# Altium PCB 856_PCB_MB.PcbDoc
Units mm, origin at the board's own origin, x right, y up, seen from the top; angles counter-clockwise.
Board outline 150 x 115 mm, 4 copper layers (Top Layer, GND, Power, Bottom Layer), stack 0.603 mm thick; 26 components, 53 nets, 263 pads, 0 vias.
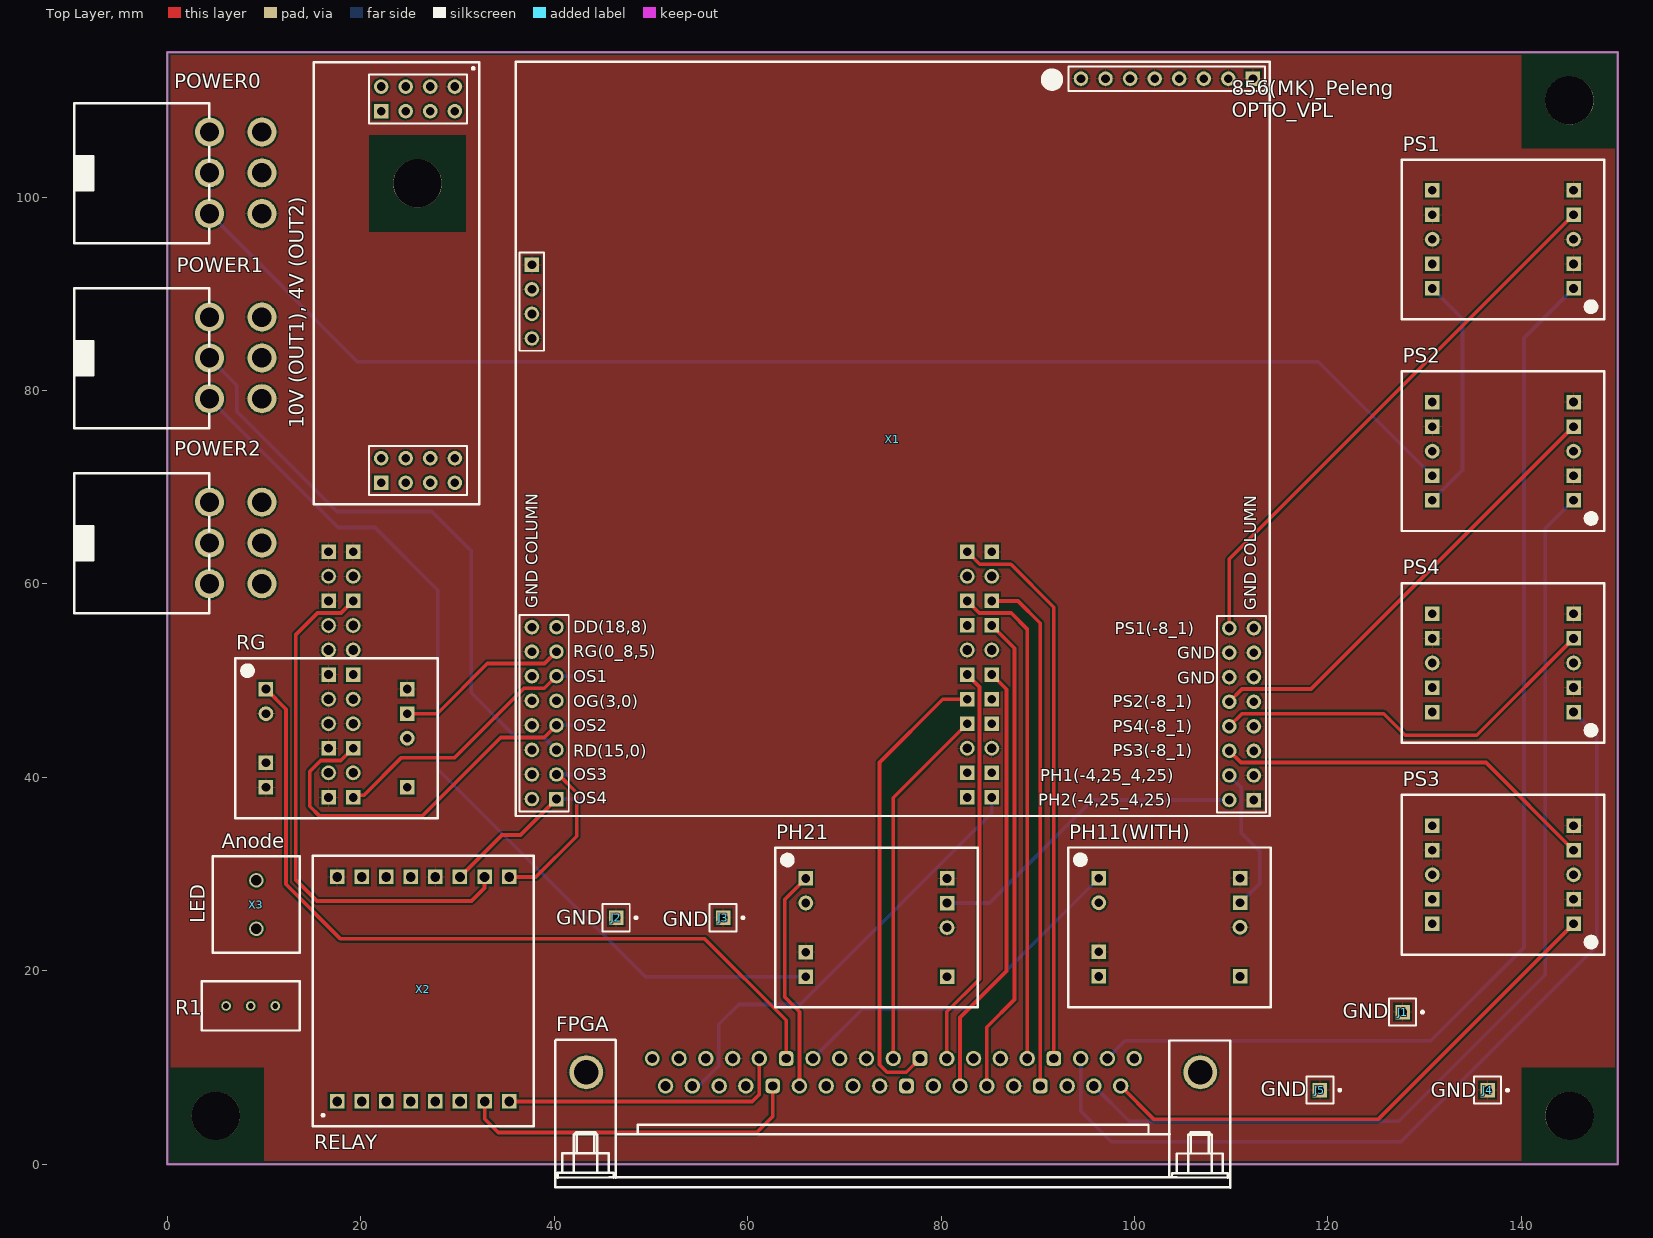
[diagram p0: Top Layer view]
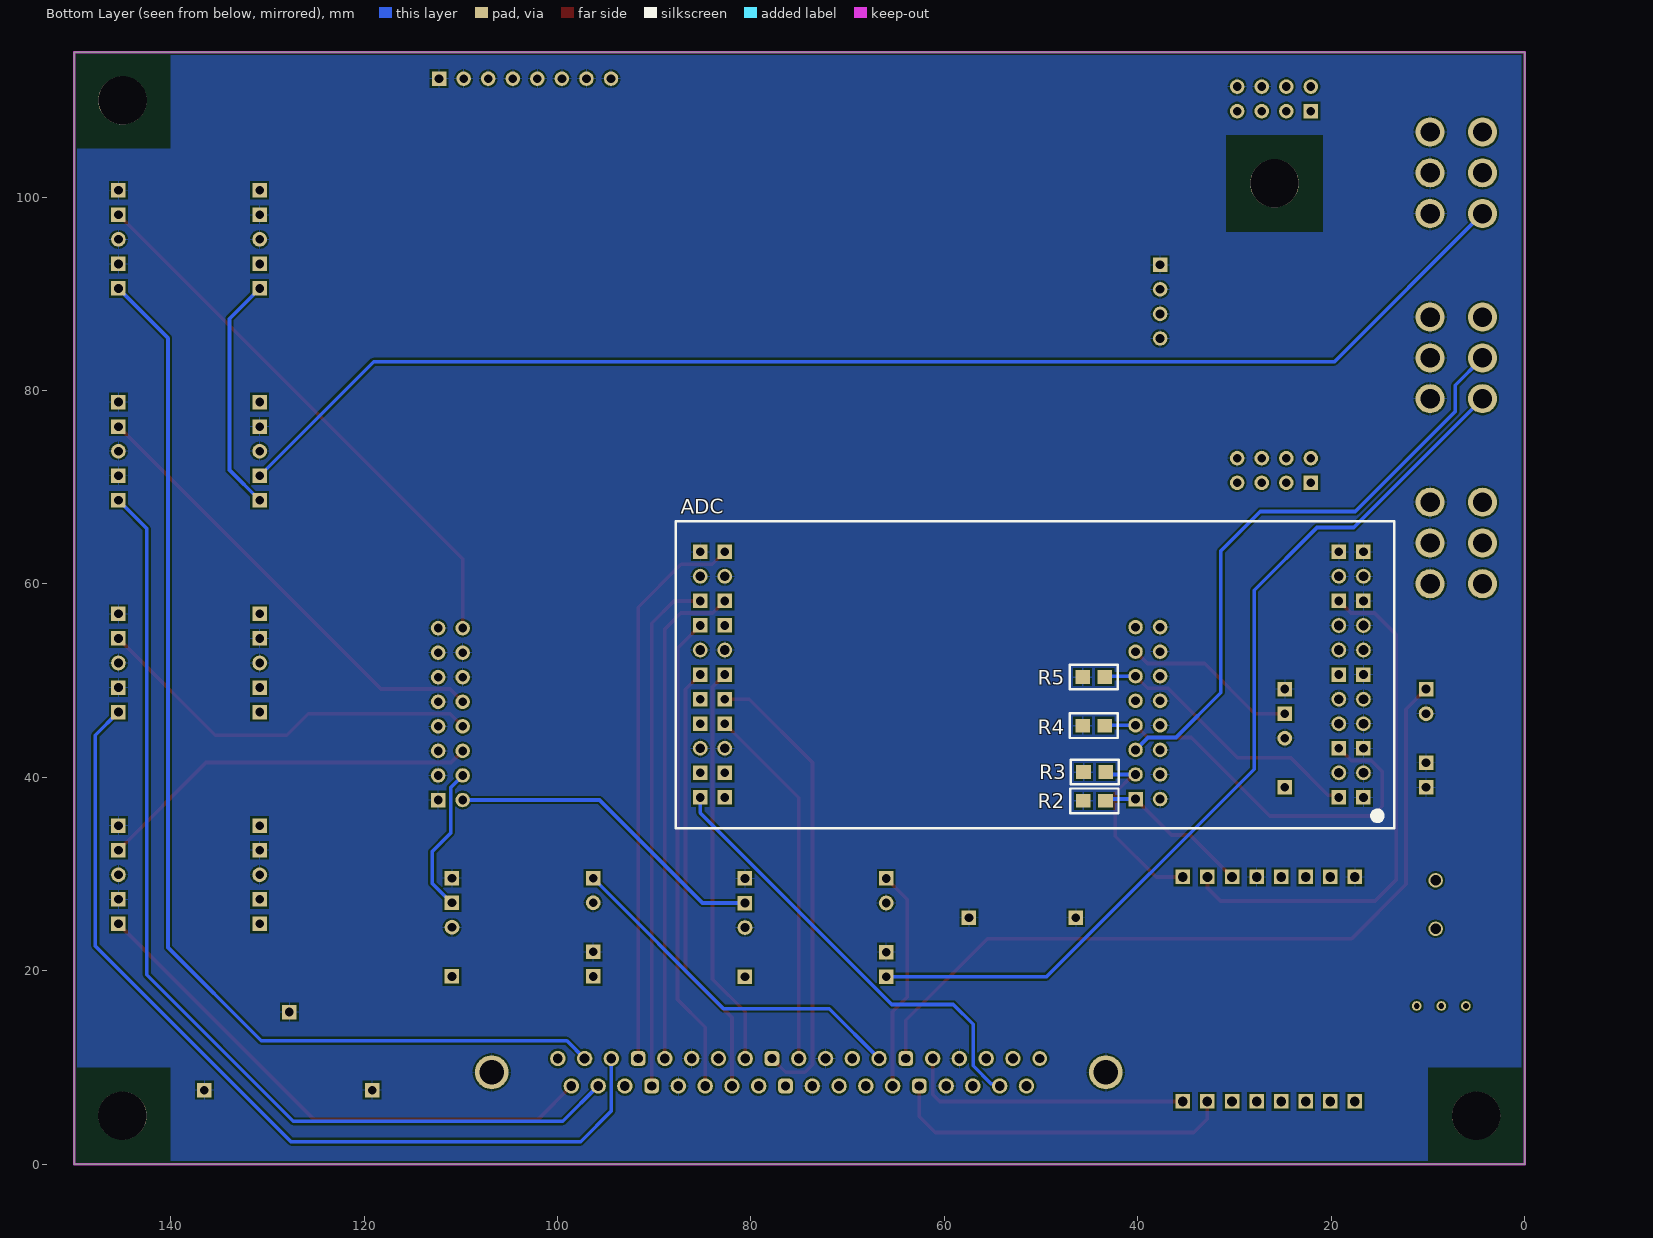
[diagram p1: Bottom Layer view, seen from below]
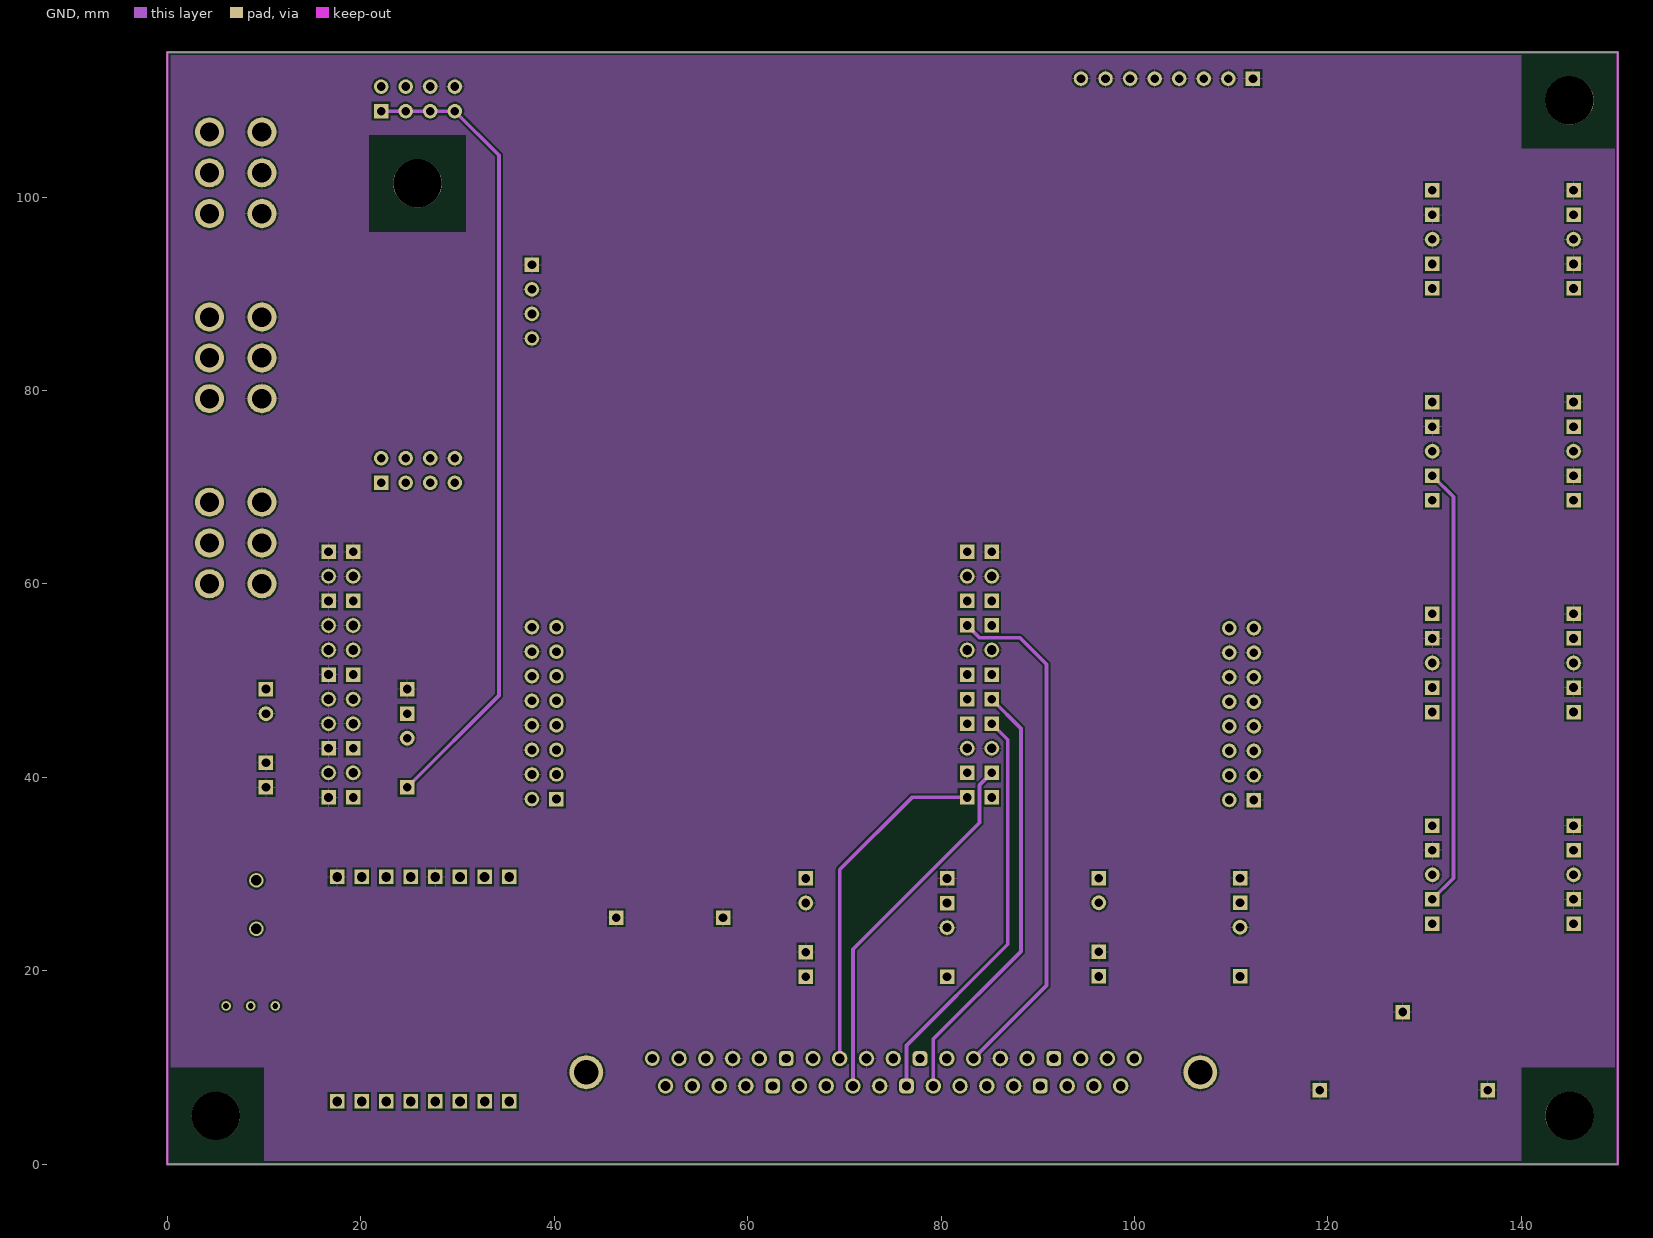
[diagram p2: GND]
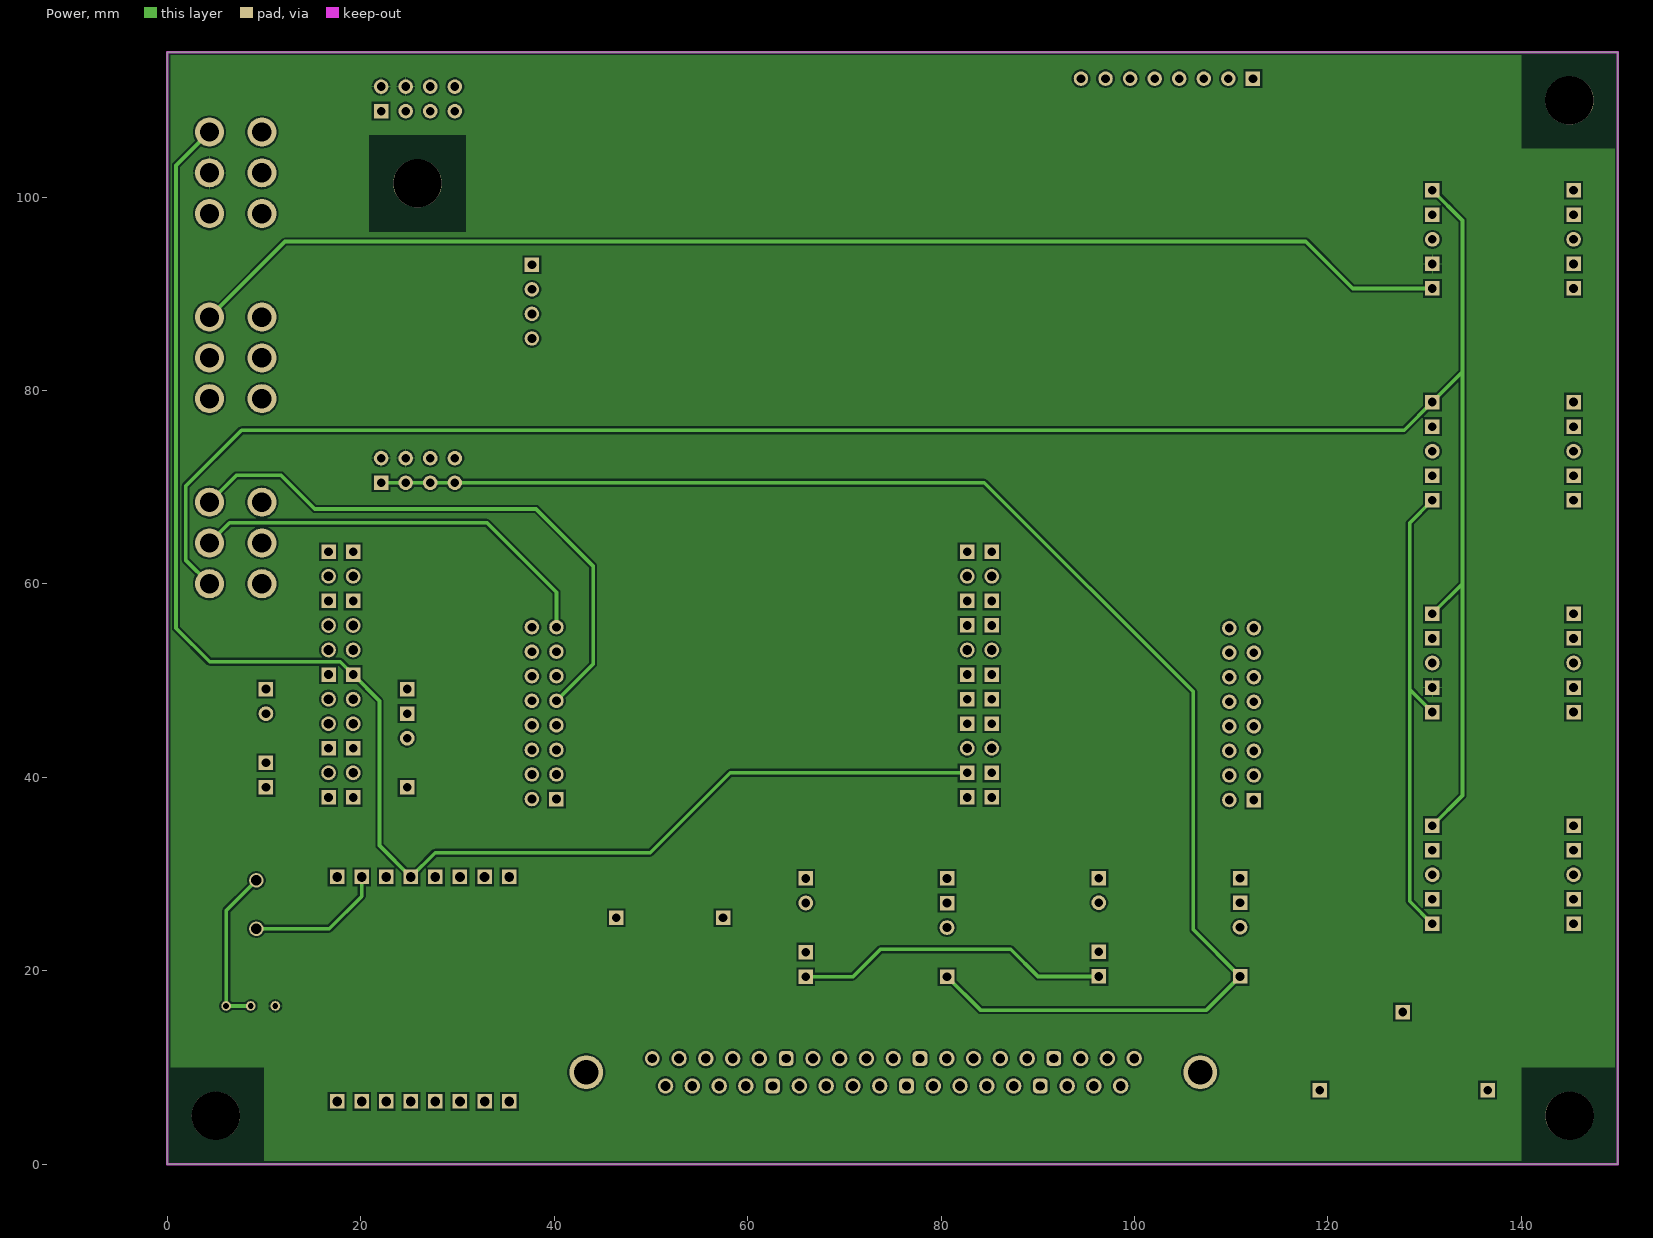
[diagram p3: Power]

## Layer stack, top to bottom
Top Solder: solder mask 0.0102, Solder Resist, Dk 3.5
Top Layer: signal copper 0.0356
Dielectric 2: prepreg 0.0711, PP-006, Dk 4.1
GND: signal copper 0.035
Dielectric 1: dielectric 0.32, FR-4, Dk 4.8
Power: signal copper 0.035
Dielectric 3: prepreg 0.0711, PP-006, Dk 4.1
Bottom Layer: signal copper 0.0356
Bottom Solder: solder mask 0.0102, Solder Resist, Dk 3.5

## Board outline
0,0 150,0 150,115 0,115

## Design rules (kind name [scope] priority, off if disabled: settings)
BoardOutlineClearance [OnLayer('Multi-Layer')] p1: gap=0.254 ignorepadtopadclearanceinfootprint=FALSE except(0: Arc-SplitContinuation Track-SplitContinuation SMDPad-SplitContinuation THPad-SplitContinuation Via-SplitContinuation Fill-SplitContinuation Poly-SplitContinuation Region-SplitContinuation Text-SplitContinuation; 0.4: Arc-OutlineEdge Track-OutlineEdge SMDPad-OutlineEdge THPad-OutlineEdge Via-OutlineEdge Fill-OutlineEdge Poly-OutlineEdge Region-OutlineEdge Text-OutlineEdge)
Clearance [All] p1: gap=0.125 ignorepadtopadclearanceinfootprint=FALSE except(0.2: Arc-Fill Arc-Poly Track-Fill Track-Poly SMDPad-Fill SMDPad-Poly THPad-Fill THPad-Poly Via-Fill Via-Poly Fill-Fill Fill-Poly Poly-Poly Poly-Region Poly-Text; 0.25: Arc-Hole Track-Hole SMDPad-Hole THPad-Hole Via-Hole Fill-Hole Poly-Hole Region-Hole Text-Hole) // Standart
DiffPairsRouting [All] p1: maxlimit=0.254 minlimit=0.127 mostfreqgap=0.13 toplayer_minwidth=0.127 toplayer_maxwidth=0.381 toplayer_prefwidth=0.37 midlayer1_minwidth=0.127 midlayer1_maxwidth=0.381 midlayer1_prefwidth=0.37 midlayer2_minwidth=0.127 midlayer2_maxwidth=0.381 midlayer2_prefwidth=0.37 bottomlayer_minwidth=0.127 bottomlayer_maxwidth=0.381 bottomlayer_prefwidth=0.37 maxuncoupledlength=12.7
HoleSize [All] p1: absolutevalues=TRUE maxlimit=5 minlimit=0.3 maxpercent=80.000 minpercent=20.000
MinimumSolderMaskSliver [All] p1: minsoldermaskwidth=0.1
PlaneClearance "PlaneClearance-1 1/2 Oz" [All] p1: clearance=0.2 // Standart
PlaneConnect "TermalConnect-1 1/2 Oz" [All] p1: planeconnectstyle=Relief reliefexpansion=0.2 reliefentries=4 reliefconductorwidth=0.2 reliefairgap=0.2 // Standart
PolygonConnect "PolygonConnect-1 1/2 Oz" [All] p1: thpad.connectstyle=Relief thpad.reliefconductorwidth=0.15 thpad.reliefentries=4 thpad.polygonreliefangle="90 Angle" thpad.airgapwidth=0.2 smdpad.connectstyle=Relief smdpad.reliefconductorwidth=0.2 smdpad.reliefentries=4 smdpad.polygonreliefangle="90 Angle" smdpad.airgapwidth=0.2 via.connectstyle=Direct via.reliefconductorwidth=0.254 via.reliefentries=4 via.polygonreliefangle="90 Angle" via.airgapwidth=0.254 // Standart
RoutingVias [All] p1: holewidth=0.3 width=1.27 viastyle="Through Hole" minholewidth=0.3 minwidth=0.6 maxholewidth=0.711 maxwidth=1.27
SilkToSilkClearance [All] p1: silktosilkclearance=0
SilkToSolderMaskClearance [IsPad] p1: minsilkscreentomaskgap=0 clearancetoexposedcopper=TRUE
SolderMaskExpansion [All] p1: expansion=0.102 istentingtop=FALSE
UnRoutedNet [All] p1: checkbadconnections=TRUE
Width [All] p1: maxlimit=2.5 minlimit=0.125 preferedwidth=0.37
22 further rules are at their usual default settings.

## Components (designator, comment, footprint, x,y, rotation, side; value= is the part's Value field where it differs from the comment)
"10V (OUT1), 4V (OUT2)" "MEZ_POWER" MEZON_POWER_NEW 29.718,111.43 r270 top
ADC "MEZON_ADC" MEZON_ADC 16.662,37.922 r0 bottom
FPGA "CHEAP_CON_37_FEMALE" CHEAP_CONN_FEMALE 106.807,9.5 r180 top
J1 "GND" PIN1 127.737,15.723 r270 top
J2 "GND" PIN1 46.406,25.476 r270 top
J3 "GND" PIN1 57.455,25.476 r270 top
J4 "GND" PIN1 136.525,7.645 r270 top
J5 "GND" PIN1 119.177,7.645 r270 top
PH11(WITH) "MEZON_H" MEZON_H 96.317,29.566 r0 top
PH21 "MEZON_H" MEZON_H 66.015,29.54 r0 top
POWER0 "POWER" POWER 4.343,106.731 r90 top
POWER1 "POWER" POWER 4.343,87.592 r90 top
POWER2 "POWER" POWER 4.343,68.453 r90 top
PS1 "MEZON_V+15" MEZON_V 145.415,90.551 r180 top
PS2 "MEZON_V" MEZON_V 145.415,68.648 r180 top
PS3 "MEZON_V" MEZON_V 145.415,24.841 r180 top
PS4 "MEZON_V+15" MEZON_V 145.415,46.744 r180 top
R1 "3296" PODSTR_RES_3296 11.151,16.358 r180 top
R2 "1,62кОм" RES 46.965,38.811 r270 bottom
R3 "1,62кОм" RES 46.939,41.783 r270 bottom
R4 "1,62кОм" RES 47.041,46.584 r270 bottom
R5 "1,62кОм" RES 47.041,51.613 r270 bottom
RG "MEZON_H" MEZON_H 10.185,49.124 r0 top
X1 "856_Peleng_MEZ" 856_Peleng_MEZ 36,36 r0 top locked
X2 "RELAY" RELAY_MODULE 35.357,6.477 r90 top
X3 "LED" KLEMMNIK_2 9.191,29.337 r270 top

## Footprints (in the part's own frame and the unit in brackets; to place one, negate y for a bottom-side part, rotate by r counter-clockwise, add the part's x,y. Pads: shape width x height; smd on the part's side, far side on the other; paste and mask are expansions set on the pad)
856_Peleng_MEZ [mm]
  round 1.5 hole 0.9: 1(58.471,76.251) 2(61.011,76.251) 3(63.551,76.251) 4(66.091,76.251) 5(68.631,76.251) 6(71.171,76.251) 7(73.711,76.251) 9(73.812,19.431) 10(76.352,19.431) 11(73.812,16.891) 12(76.352,16.891) 13(73.812,14.351) 14(76.352,14.351) 15(73.812,11.811) 16(76.352,11.811) 17(73.812,9.271) 18(76.352,9.271) 19(73.812,6.731) 20(76.352,6.731) 21(73.812,4.191) 22(76.352,4.191) 23(73.812,1.651) 25(1.69,19.533) 26(4.23,19.533) 27(1.69,16.993) 28(4.23,16.993) 29(1.69,14.453) 30(4.23,14.453) 31(1.69,11.913) 32(4.23,11.913) 33(1.69,9.373) 34(4.23,9.373) 35(1.69,6.833) 36(4.23,6.833) 37(1.69,4.293) 38(4.23,4.293) 39(1.69,1.753) 41(1.69,49.38) 42(1.69,51.92) 43(1.69,54.46)
  rect 1.5x1.5 hole 0.9: 8(76.251,76.251) 24(76.352,1.651) 40(4.23,1.753) 44(1.69,57)
  silkscreen extent 0,0 78,78
CHEAP_CONN_FEMALE [mm] "CHEAP_CONN_FEMALE"
  round 1.6 hole 1: 1(6.833,-1.422) 2(9.601,-1.422) 3(12.37,-1.422) 5(17.907,-1.422) 6(20.676,-1.422) 7(23.444,-1.422) 8(26.213,-1.422) 10(31.75,-1.422) 11(34.519,-1.422) 12(37.287,-1.422) 13(40.056,-1.422) 15(45.593,-1.422) 16(48.362,-1.422) 17(51.13,-1.422) 18(53.899,-1.422) 20(8.23,1.422) 21(10.998,1.422) 22(13.767,1.422) 24(19.304,1.422) 25(22.073,1.422) 26(24.841,1.422) 27(27.61,1.422) 29(33.147,1.422) 30(35.916,1.422) 31(38.684,1.422) 32(41.453,1.422) 34(46.99,1.422) 35(49.759,1.422) 36(52.527,1.422) 37(55.296,1.422)
  rrect50% 1.524x1.524 hole 0.965: 4(15.138,-1.422) 9(28.981,-1.422) 14(42.824,-1.422) 23(16.535,1.422) 28(30.378,1.422) 33(44.221,1.422)
  round 1.524 hole 0.965: 19(56.667,-1.422)
  round 3.5 hole 2.5: 38(0,0) 39(63.5,0)
  silkscreen extent -3.11,-3.36 66.72,11.92
KLEMMNIK_2 [mm]
  round 1.5 hole 1.1: 1(0,0) 2(5,0)
  silkscreen extent -2.5,-4.5 7.5,4.5
MEZON_ADC [mm] "MEZON_ADC"
  rect 1.5x1.5 hole 0.9: 1(0,0) 2(2.54,0) 5(0,-5.08) 6(2.54,-5.08) 11(0,-12.7) 12(2.54,-12.7) 17(0,-20.32) 18(2.54,-20.32) 21(0,-25.4) 22(2.54,-25.4) 23(66.04,-25.4) 24(68.58,-25.4) 27(66.04,-20.32) 28(68.58,-20.32) 29(66.04,-17.78) 30(68.58,-17.78) 33(66.04,-12.7) 34(68.58,-12.7) 35(66.04,-10.16) 36(68.58,-10.16) 37(66.04,-7.62) 38(68.58,-7.62) 41(66.04,-2.54) 42(68.58,-2.54) 43(66.04,0) 44(68.58,0)
  round 1.524 hole 1: 3(0,-2.54) 4(2.54,-2.54) 7(0,-7.62) 8(2.54,-7.62) 9(0,-10.16) 10(2.54,-10.16) 13(0,-15.24) 14(2.54,-15.24) 15(0,-17.78) 16(2.54,-17.78) 19(0,-22.86) 20(2.54,-22.86) 25(66.04,-22.86) 26(68.58,-22.86) 31(66.04,-15.24) 32(68.58,-15.24) 39(66.04,-5.08) 40(68.58,-5.08)
  silkscreen extent -3.17,-28.57 71.12,3.18
MEZON_H [mm]
  rect 1.5x1.5 hole 0.9: 1(0,0) 3(0,-7.62) 4(0,-10.16) 5(14.605,-10.16) 7(14.605,-2.54) 8(14.605,0)
  round 1.524 hole 0.9: 2(0,-2.54) 6(14.605,-5.08)
  silkscreen extent -3.17,-13.33 17.78,3.17
MEZON_POWER_NEW [mm]
  round 1.5 hole 0.9: 1(0,0) 1(0,-2.54) 2(0,-5.08) 2(0,-7.62) 3(2.54,0) 3(2.54,-2.54) 3(2.54,-5.08) 4(38.43,-2.54) 4(38.43,0) 5(38.43,-7.62) 5(38.43,-5.08) 6(40.97,0) 6(40.97,-5.08) 6(40.97,-2.54)
  rect 1.5x1.5 hole 0.9: 3(2.54,-7.62) 6(40.97,-7.62)
  silkscreen extent -2.51,-14.61 43.21,2.54
MEZON_V [mm]
  rect 1.5x1.5 hole 0.9: 1(0,0) 2(0,-2.54) 4(0,-7.62) 5(0,-10.16) 6(14.605,-10.16) 7(14.605,-7.62) 9(14.605,-2.54) 10(14.605,0)
  round 1.524 hole 0.9: 3(0,-5.08) 8(14.605,-5.08)
  silkscreen extent -3.18,-13.33 17.78,3.18
PIN1 [mm] "Connector; Plug"
  rect 1.5x1.5 hole 0.9: 1(0,0)
  silkscreen extent -1.4,-1.4 1.4,2.17
PODSTR_RES_3296 [mm]
  round 1 hole 0.6: 1(0,0) 2(2.54,0) 3(5.08,0)
  silkscreen extent -2.54,-2.54 7.62,2.54
POWER [mm] "POWER"
  round 3 hole 2: 1(0,0) 2(-4.217,0) 3(-8.435,0) 4(-8.435,-5.422) 5(-4.217,-5.422) 6(0,-5.423)
  silkscreen extent -11.5,0 3,14
RELAY_MODULE [mm]
  rect 1.5x1.5 hole 1: 1(0,17.805) 2(0,15.265) 3(0,12.725) 4(0,10.185) 5(0,7.645) 6(0,5.105) 7(0,2.54) 8(0,0) 9(23.216,0.025) 10(23.216,2.565) 11(23.216,5.105) 12(23.216,7.645) 13(23.216,10.185) 14(23.216,12.725) 15(23.216,15.265) 16(23.216,17.805)
  silkscreen extent -2.54,-2.54 25.4,20.32
RES [mil] "FROM_MAX"
  rect 55.98x60 smd: 1(49,52.71) 2(49,142.71)
  silkscreen extent -1,0 99,196, body extent 17,19 81,177, height 100

## Part data
"10V (OUT1), 4V (OUT2)": library part MEZON_POWER_NEW
J1 J2 J3 J4 J5: library part Socket, "Socket", LatestRevisionDate=17-Jul-2002, LatestRevisionNote="Re-released for DXP Platform.", Publisher="Altium Limited"
PS1 PS4: library part MEZON_V_+15
R1: library part PODSTR_RES_NEW
R2 R3 R4 R5: library part RES
X2: library part MEZON_RELAY
X3: library part KLEMMNIK_2

## Free pads (board coordinates)
  round 5 hole 5 unplated: H(5,5) H(25.857,101.422) H(144.983,110.007) H(145,5)

## Nets (pads, with @x,y where several pads share a name; then routed paths per layer and width w, separated by ;. In a path a pad name is that pad's centre, name@x,y a point inside that pad or via, vN(x,y) a via of type N, cw(c..) or ccw(c..) an arc to the next point about the centre after c; other vN are vias at no path point)
1V: POWER1.1 PS1.10 PS2.10 PS3.10 PS4.10 | length 205.2
  Power w0.381: POWER1.1 12.154,95.402 117.729,95.402 122.58,90.551 PS1.10 ; PS3.10 128.473,27.178 128.473,49.081 ; PS4.10 128.473,49.081 ; PS2.10 128.473,66.311 128.473,49.081
  Bottom Layer w0.381: PS2.10 133.934,71.772 133.934,87.427 PS1.10
2V: POWER2.1 X1.32 | length 60.2
  Power w0.381: POWER2.1 7.112,71.222 11.76,71.222 15.24,67.742 38.125,67.742 44.018,61.849 44.018,51.701 X1.32
4V: "10V (OUT1), 4V (OUT2).6" PH11(WITH).5 PH21.5 | length 157.6
  Power w0.381: 22.098,70.46 24.638,70.46 27.178,70.46 29.718,70.46 84.48,70.46 106.096,48.844 106.096,24.232 110.922,19.406 107.442,15.926 84.074,15.926 PH21.5
10V: "10V (OUT1), 4V (OUT2).3" RG.5 | length 83.4
  GND w0.381: 22.098,108.89 24.638,108.89 27.178,108.89 29.718,108.89 34.29,104.318 34.29,48.463 RG.5
14.5V: POWER1.2 X1.36 | length 62.9
  Bottom Layer w0.381: POWER1.2 7.163,80.555 7.163,77.826 17.501,67.488 27.33,67.488 31.42,63.398 31.42,48.743 36.043,44.12 38.943,44.12 X1.36
18.5V: POWER2.2 X1.26 | length 43.3
  Power w0.381: POWER2.2 6.427,66.319 33.045,66.319 40.23,59.135 X1.26
-4V: PH11(WITH).4 PH21.4 POWER1.3 | length 129.9
  Power w0.381: PH21.4 70.891,19.38 73.736,22.225 87.198,22.225 90.018,19.406 96.317,19.406
  Bottom Layer w0.381: POWER1.3 17.663,65.837 21.463,65.837 27.965,59.334 27.965,40.843 49.428,19.38 PH21.4
-8V: POWER2.3 PS1.6 PS2.6 PS3.6 PS4.6 | length 220.8
  Power w0.381: POWER2.3 1.88,62.482 1.88,70.104 7.671,75.895 127.897,75.895 PS2.6 133.934,81.932 ; PS3.6 133.934,38.125 133.934,60.029 ; PS4.6 133.934,60.029 ; PS1.6 133.934,97.587 133.934,81.932 ; 133.934,60.029 133.934,81.932
-15V: POWER0.3 PS2.9 PS3.9 | length 183.3
  GND w0.381: PS3.9 132.994,29.566 132.994,69.003 PS2.9
  Bottom Layer w0.381: POWER0.3 19.657,82.982 119.016,82.982 PS2.9
ADCCLK: ADC.27 FPGA.5 | length 51.8
  Top Layer w0.381: ADC.27 83.947,56.998 87.249,56.998 88.9,55.347 FPGA.5
CDSCLK1: ADC.23 FPGA.4 | length 58
  Top Layer w0.381: ADC.23 83.998,62.027 87.224,62.027 91.669,57.582 FPGA.4
CDSCLK2: ADC.28 FPGA.23 | length 53.8
  Top Layer w0.381: ADC.28 87.96,58.242 90.272,55.931 FPGA.23
D0: ADC.30 FPGA.25 | length 49.8
  Top Layer w0.381: FPGA.25 84.734,14.148 87.605,17.018 87.605,53.34 ADC.30
D1: ADC.29 FPGA.7 | length 53.8
  GND w0.381: ADC.29 83.972,54.432 88.163,54.432 90.907,51.689 90.907,18.466 FPGA.7
D2: ADC.34 FPGA.26 | length 45.2
  Top Layer w0.381: FPGA.26 81.966,15.164 86.766,19.964 86.766,49.098 ADC.34
D3: ADC.33 FPGA.8 | length 41.6
  Top Layer w0.381: FPGA.8 80.594,15.748 83.972,19.126 83.972,49.352 ADC.33
D4: ADC.36 FPGA.27 | length 45
  GND w0.381: FPGA.27 79.197,12.929 88.265,21.996 88.265,45.06 ADC.36
D5: ADC.35 FPGA.9 | length 48.1
  Top Layer w0.381: FPGA.9 76.403,9.5 74.422,9.5 73.635,10.287 73.635,41.529 80.188,48.082 ADC.35
D6: ADC.38 FPGA.28 | length 42.5
  GND w0.381: FPGA.28 76.429,12.268 86.893,22.733 86.893,43.891 ADC.38
D7: ADC.37 FPGA.10 | length 37.8
  Top Layer w0.381: FPGA.10 75.057,37.897 ADC.37
GND: "10V (OUT1), 4V (OUT2).1" "10V (OUT1), 4V (OUT2).4" ADC.1 ADC.3 ADC.4 ADC.5 ADC.7 ADC.8 ADC.9 ADC.10 ADC.11 ADC.13 ADC.14 ADC.15 ADC.16 ADC.17 ADC.19 ADC.20 ADC.21 ADC.22 ADC.24 ADC.25 ADC.26 ADC.31 ADC.32 ADC.39 ADC.40 FPGA.6 FPGA.11 FPGA.16 FPGA.24 FPGA.29 FPGA.34 FPGA.38 FPGA.39 J1.1 J2.1 J3.1 J4.1 J5.1 PH11(WITH).2 PH11(WITH).3 PH11(WITH).6 PH11(WITH).8 PH21.2 PH21.3 PH21.6 PH21.8 POWER0.4 POWER0.5 POWER0.6 POWER1.4 POWER1.5 POWER1.6 POWER2.4 POWER2.5 POWER2.6 PS1.2 PS1.3 PS1.5 PS1.7 PS1.8 PS2.2 PS2.3 PS2.5 PS2.7 PS2.8 PS3.2 PS3.3 PS3.5 PS3.7 PS3.8 PS4.2 PS4.3 PS4.5 PS4.7 PS4.8 R2.1 R3.1 R4.1 R5.1 RG.2 RG.3 RG.4 RG.6 RG.8 X1.1 X1.2 X1.3 X1.4 X1.5 X1.6 X1.7 X1.8 X1.10 X1.11 X1.12 X1.13 X1.14 X1.16 X1.18 X1.20 X1.22 X1.24 X1.25 X1.27 X1.29 X1.31 X1.33 X1.35 X1.37 X1.39 X1.41 X1.42 X1.43 X1.44 X2.12 X2.16
LED_CAT: X2.15 X3.2 | length 14.3
  Power w0.381: X3.2 16.742,24.337 20.091,27.686 X2.15
NetR1_2: R1.2 R1.3 X3.1 | length 16.8
  Power w0.381: R1.2 R1.3 6.071,26.217 X3.1
OS1: ADC.2 R5.2 X1.30 | length 29.4
  Top Layer w0.381: ADC.2 19.412,38.132 20.301,38.132 24.206,42.037 29.718,42.037 36.881,49.2 38.977,49.2 X1.30
  Bottom Layer w0.381: X1.30 43.332,50.453 R5.2
OS2: ADC.6 R4.2 X1.34 | length 42.1
  Top Layer w0.381: ADC.6 17.932,41.732 15.85,41.732 14.707,40.589 14.707,37.008 15.723,35.992 26.34,35.992 34.468,44.12 38.977,44.12 X1.34
  Bottom Layer w0.381: X1.34 43.382,45.373 R4.2
OS3: R3.2 X1.38 X2.9 | length 19.3
  Top Layer w0.381: X2.9 38.1,29.693 42.316,33.909 42.316,38.405 40.429,40.293 X1.38
  Bottom Layer w0.381: X1.38 43.069,40.293 R3.2
OS4: R2.2 X1.40 X2.11 | length 16.5
  Top Layer w0.381: X2.11 34.595,34.036 36.513,34.036 X1.40
  Bottom Layer w0.381: X1.40 43.154,37.753 R2.2
P0.0: FPGA.15 X2.8 | length 29.9
  Top Layer w0.381: X2.8 60.477,6.477 61.214,7.214 FPGA.15
P0.1: FPGA.33 X2.7 | length 36
  Top Layer w0.381: X2.7 32.817,4.674 34.214,3.277 60.935,3.277 62.586,4.928 FPGA.33
P0.2: FPGA.14 RG.1 | length 82.6
  Top Layer w0.381: RG.1 12.268,47.041 12.268,28.931 17.907,23.292 55.575,23.292 63.983,14.884 FPGA.14
P0.3: FPGA.32 PH21.1 | length 23
  Top Layer w0.381: FPGA.32 65.354,15.748 63.83,17.272 63.83,27.356 PH21.1
P0.4: FPGA.13 PH11(WITH).1 | length 37.3
  Bottom Layer w0.381: FPGA.13 71.907,16.078 82.829,16.078 96.317,29.566
P0.5: FPGA.31
P2.3: FPGA.22
P2.4: FPGA.3 PS4.1 | length 93.7
  Bottom Layer w0.381: FPGA.3 94.437,5.486 97.612,2.311 127.559,2.311 147.803,22.555 147.803,44.357 PS4.1
P2.5: FPGA.21 PS2.1 | length 104.8
  Bottom Layer w0.381: FPGA.21 99.466,4.42 127.33,4.42 142.494,19.583 142.494,65.727 PS2.1
P2.6: FPGA.2 PS1.1 | length 118.1
  Bottom Layer w0.381: FPGA.2 99.035,12.751 130.632,12.751 140.284,22.403 140.284,85.42 PS1.1
P2.7: FPGA.20 PS3.1 | length 56.6
  Top Layer w0.381: FPGA.20 102.032,4.623 125.197,4.623 PS3.1
PFI2: FPGA.17
PFI3: FPGA.35
PH11: PH11(WITH).7 X1.21 | length 15.3
  Bottom Layer w0.381: X1.21 111.049,38.955 111.049,34.239 112.954,32.334 112.954,29.007 111.532,27.585 111.481,27.585 110.922,27.026
PH21: PH21.7 X1.23 | length 33.6
  Bottom Layer w0.381: PH21.7 85.014,27 95.665,37.651 X1.23
POWER_ADC: ADC.12 ADC.41 POWER0.1 X2.13 | length 158.4
  Power w0.381: POWER0.1 0.889,103.276 0.889,55.423 4.369,51.943 17.882,51.943 ADC.12 21.92,47.904 21.92,32.944 X2.13 27.686,32.207 49.936,32.207 58.191,40.462 ADC.41
PS1: PS1.4 X1.9 | length 57.5
  Top Layer w0.381: X1.9 109.812,62.568 PS1.4
PS2: PS2.4 X1.15 | length 47.4
  Top Layer w0.381: X1.15 111.125,49.124 118.271,49.124 PS2.4
PS3: PS3.4 X1.19 | length 39.9
  Top Layer w0.381: X1.19 111.014,41.529 136.347,41.529 PS3.4
PS4: PS4.4 X1.17 | length 41.2
  Top Layer w0.381: X1.17 111.125,46.584 125.781,46.584 128.016,44.348 135.399,44.348 PS4.4
RG: RG.7 X1.28 | length 18.1
  Top Layer w0.381: RG.7 27.889,46.584 33.071,51.765 39.003,51.765 X1.28
SCLK: ADC.43 FPGA.12 | length 35.8
  GND w0.381: FPGA.12 69.52,30.455 76.987,37.922 ADC.43
SDATA: ADC.44 FPGA.36 | length 46.8
  Bottom Layer w0.381: FPGA.36 54.513,8.31 55.173,8.31 57.023,10.16 57.023,14.453 59.08,16.51 65.43,16.51 85.242,36.322 ADC.44
SLOAD: ADC.42 FPGA.30 | length 38.3
  GND w0.381: FPGA.30 70.891,22.225 83.972,35.306 83.972,39.192 ADC.42
"STAB (+15)": "10V (OUT1), 4V (OUT2).2" "10V (OUT1), 4V (OUT2).5" POWER0.2 PS1.9 PS4.9 R1.1
VINR: ADC.18 X2.10 | length 54.8
  Top Layer w0.381: ADC.18 17.958,56.998 15.519,56.998 13.284,54.762 13.284,29.388 15.469,27.203 31.445,27.203 32.791,28.55 X2.10
pads on no net: FPGA.1 FPGA.18 FPGA.19 FPGA.37 X2.1 X2.2 X2.3 X2.4 X2.5 X2.6 X2.14

## Polygon pours and split planes (outlines as drawn)
GND on GND "Top Overlay-No Net" (solid, remove dead copper, pour order 0): 0,115 0,0 150,0 150,115
"STAB (+15)" on Power "Top Overlay-No Net" (solid, remove dead copper, pour order 1): 0,115 0,0 150,0 150,115
GND on Top Layer "Top Overlay-No Net" (solid, remove dead copper, pour order 2): 0,115 0,0 150,0 150,115
GND on Bottom Layer "Top Overlay-No Net" (solid, remove dead copper, pour order 3): 0,115 0,0 150,0 150,115

## Keep-outs
Keep-Out Layer:
  the board outline again, w0.254

## Other copper
Multi-Layer:
  pour cut-out: 30.857,106.422 30.857,96.422 20.857,96.422 20.857,106.422
  pour cut-out: 10,10 10,0 0,0 0,10
  pour cut-out: 150,10 150,0 140,0 140,10
  pour cut-out: 149.983,115.007 149.983,105.007 139.983,105.007 139.983,115.007

## Silkscreen, mask and mechanical layers (free items; w line width, h text height)
Top Overlay:
  text "856(MK)_Peleng / OPTO_VPL" at 110.064,108.268 h1.52

## Text inside footprints (layer, text, board x,y; h text height)
X1: Top Overlay "PS1(-8_1)" at 97.965,54.812 h1.25; Top Overlay "GND COLUMN" at 112.577,57.254 h1.25 r90; Top Overlay "PS2(-8_1)" at 97.757,47.262 h1.25; Top Overlay "PS4(-8_1)" at 97.757,44.662 h1.25; Top Overlay "PS3(-8_1)" at 97.757,42.162 h1.25; Top Overlay "PH1(-4,25_4,25)" at 90.26,39.596 h1.25; Top Overlay "PH2(-4,25_4,25)" at 90.06,37.046 h1.25; Top Overlay "GND" at 104.422,52.279 h1.25; Top Overlay "GND" at 104.422,49.679 h1.25; Top Overlay "OS4" at 41.991,37.254 h1.25; Top Overlay "OS3" at 41.991,39.721 h1.25; Top Overlay "RD(15,0)" at 41.983,42.132 h1.25; Top Overlay "OS2" at 41.991,44.779 h1.25; Top Overlay "OG(3,0)" at 41.983,47.262 h1.25; Top Overlay "OS1" at 41.991,49.854 h1.25; Top Overlay "GND COLUMN" at 38.283,57.479 h1.25 r90; Top Overlay "RG(0_8,5)" at 41.991,52.395 h1.25; Top Overlay "DD(18,8)" at 41.991,54.945 h1.25
X3: Top Overlay "Anode" at 5.609,32.664 h1.52